# Altium PCB IMU.PcbDoc
Units mm, origin at the board's own origin, x right, y up, seen from the top; angles counter-clockwise.
Board outline 18.03 x 76.45 mm, 2 copper layers (Top Layer, Bottom Layer); 11 components, 10 nets, 43 pads, 6 vias.
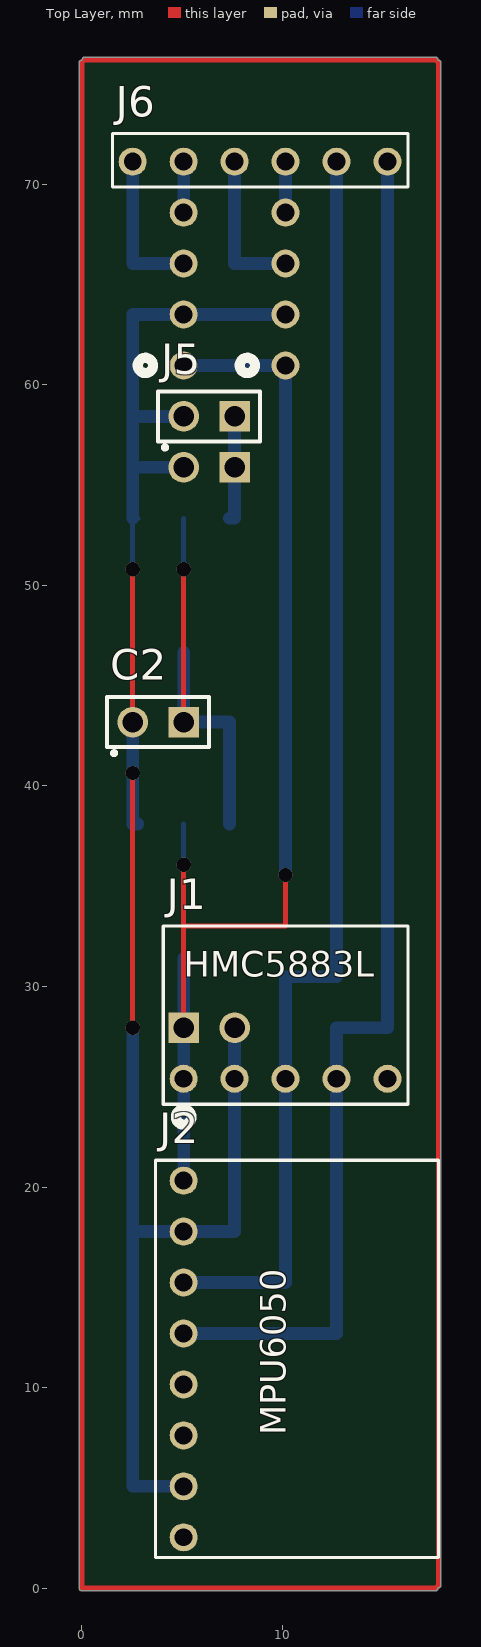
[diagram p0: Top Layer view]
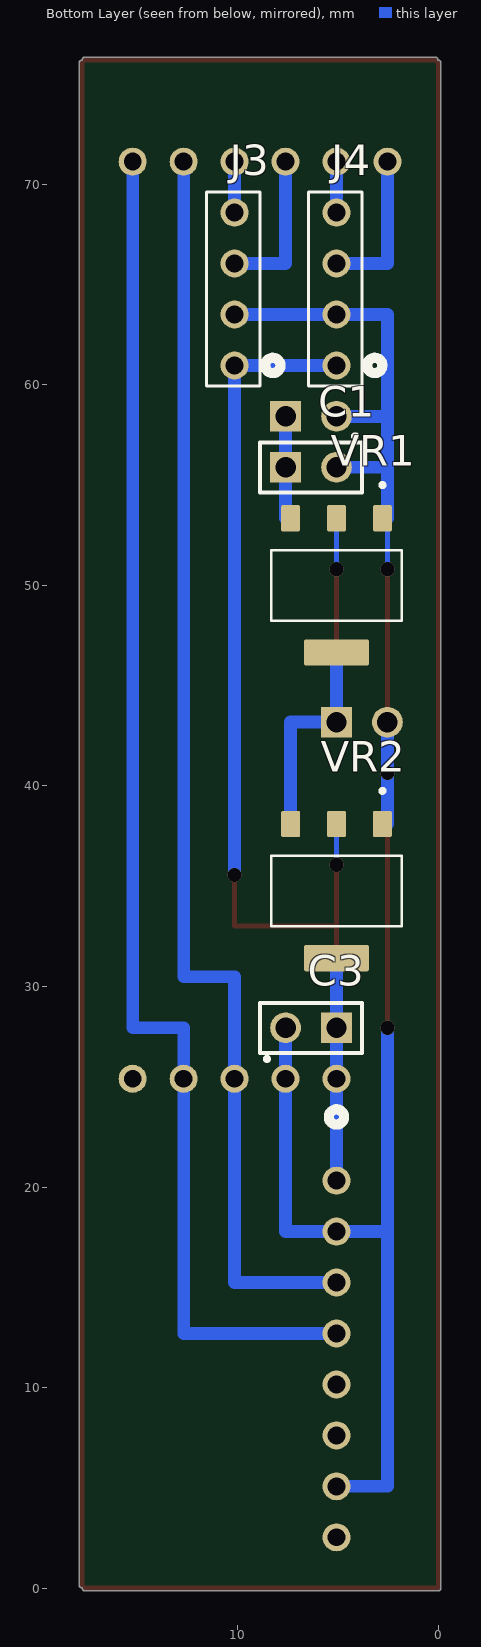
[diagram p1: Bottom Layer view, seen from below]

## Layer stack, top to bottom
Top Solder: solder mask 0.0102, Solder Resist, Dk 3.5
Top Layer: signal copper 0.0356
Dielectric 1: dielectric 0.32, FR-4, Dk 4.8
Bottom Layer: signal copper 0.0356
Bottom Solder: solder mask 0.0102, Solder Resist, Dk 3.5

## Board outline
0,-0.127 cw(c0,0) -0.127,0 -0.127,76.051 cw(c0,76.051) 0.024,76.176 cw(c0.149,76.2) 0.149,76.327 17.631,76.327 cw(c17.631,76.2) 17.759,76.2 17.756,76.176 cw(c17.78,76.051) 17.907,76.051 17.907,0.149 cw(c17.78,0.149) 17.756,0.024 17.759,0 cw(c17.631,0) 17.631,-0.127

## Design rules (kind name [scope] priority, off if disabled: settings)
Clearance [All] p1: gap=0.254 ignorepadtopadclearanceinfootprint=FALSE
PolygonConnect [All] p1: connectstyle=Relief reliefconductorwidth=0.254 reliefentries=4 polygonreliefangle="90 Angle" airgapwidth=0.254
RoutingVias [All] p1: holewidth=0.711 width=1.27 viastyle="Through Hole" minholewidth=0.711 minwidth=1.27 maxholewidth=0.711 maxwidth=1.27
SolderMaskExpansion [All] p1: expansion=0.102 istentingtop=FALSE
SupplyNets "Schematic Supply Nets_1" [InNet('GND')] p1: voltage=0.000
SupplyNets "Schematic Supply Nets" [InNet('6V5')] p2: voltage=0.000
Width [All] p1: maxlimit=0.635 minlimit=0.254 preferedwidth=0.254
30 further rules are at their usual default settings.

## Components (designator, comment, footprint, x,y, rotation, side; value= is the part's Value field where it differs from the comment)
C1 "10uF" 10UF 5.08,55.88 r0 bottom
C2 "10uF" 10UF 2.54,43.18 r0 top
C3 "10uF" 10UF 7.62,27.94 r180 bottom
J1 "HMC5883L" "5 POS HMC" 7.62,25.4 r0 top
J2 "MPU6050" "8 POS MPU6050" 5.08,7.62 r0 top
J3 "Wheel ENC" "Wheel ENC" 10.16,63.5 r90 bottom
J4 "Wheel ENC" "Wheel ENC" 5.08,63.5 r90 bottom
J5 "2 POS" "2 POS" 5.08,58.42 r0 top
J6 "6 POS" "6 POS" 15.24,71.12 r180 top
VR1 "5V" 3V3 5.08,49.995 r270 bottom
VR2 "3V3" 3V3 5.08,34.755 r270 bottom

## Footprints (in the part's own frame and the unit in brackets; to place one, negate y for a bottom-side part, rotate by r counter-clockwise, add the part's x,y. Pads: shape width x height; smd on the part's side, far side on the other; paste and mask are expansions set on the pad)
"2 POS" [mm]
  round 1.53 hole 1.02: 1(0,0)
  rect 1.53x1.53 / inner round 1.53 / far side rect 1.53x1.53 hole 1.02: 2(2.54,0)
  silkscreen extent -1.27,-1.65 3.81,1.24
3V3 [mm]
  rrect15% 1.31x0.93 smd: 1(-3.345,2.29) 2(-3.345,0) 3(-3.345,-2.29)
  rrect15% 1.31x3.24 smd: 4(3.345,0)
  silkscreen extent -5.1,-3.25 1.75,3.25, body extent -3.34,-3.25 3.65,3.25, height 1.8
"5 POS HMC" [mil]
  round 55 hole 35 paste-99999 mask+0: 1(-100,0) 2(0,0) 3(100,0) 4(200,0) 5(300,0)
  silkscreen extent -140,-90 340,300
"6 POS" [mil]
  round 55 hole 35 paste-99999 mask+0: 1(0,0) 2(100,0) 3(200,0) 4(300,0) 5(400,0) 6(500,0)
  silkscreen extent -40,-55 540,50
"8 POS MPU6050" [mil]
  round 55 hole 35 paste-99999 mask+0: 1(0,500) 2(0,400) 3(0,300) 4(0,200) 5(0,100) 6(0,0) 7(0,-100) 8(0,-200)
  silkscreen extent -55,-240 500,540
10UF [mm]
  round 1.53 hole 1.02: 1(0,0)
  rect 1.53x1.53 / inner round 1.53 / far side rect 1.53x1.53 hole 1.02: 2(2.54,0)
  silkscreen extent -1.27,-1.65 3.81,1.24
"Wheel ENC" [mil]
  round 55 hole 35 paste-99999 mask+0: 1(-100,0) 2(0,0) 3(100,0) 4(200,0)
  silkscreen extent -140,-90 240,55

## Part data
C1 C2 C3: "Pin Header, Board-to-Board, Wire-to-Board, 2.54 mm, 1 Rows, 2 Contacts, Through Hole, HTSW Series", Manufacturer=Samtec, Manufacturer Lifecycle Status=PRODUCTION, Manufacturer Part Number=HTSW-102-16-T-S, Category="Board to Board Connectors", ComponentLink1Description=https://datasheet.octopart.com:443/HTSW-102-16-T-S-Samtec-datasheet-97084101.pdf?src-supplier=Samtec, ComponentLink1URL=https://datasheet.octopart.com:443/HTSW-102-16-T-S-Samtec-datasheet-97084101.pdf?src-supplier=Samtec, ComponentLink2Description=https://sigma.octopart.com:443/14433675/technical_drawing/Samtec-HTSW-102-16-T-S.pdf?src-supplier=Samtec, ComponentLink2URL=https://sigma.octopart.com:443/14433675/technical_drawing/Samtec-HTSW-102-16-T-S.pdf?src-supplier=Samtec, ComponentLink3Description=https://datasheet.octopart.com:443/HTSW-102-16-T-S-Samtec-datasheet-150856372.pdf?src-supplier=Sager+Electronics, ComponentLink3URL=https://datasheet.octopart.com:443/HTSW-102-16-T-S-Samtec-datasheet-150856372.pdf?src-supplier=Sager+Electronics, ComponentLink4Description=https://datasheet.octopart.com:443/HTSW-102-16-T-S-Samtec-datasheet-151455181.pdf?src-supplier=Sager+Electronics, ComponentLink4URL=https://datasheet.octopart.com:443/HTSW-102-16-T-S-Samtec-datasheet-151455181.pdf?src-supplier=Sager+Electronics, ComponentLink5Description=https://datasheet.octopart.com:443/HTSW-102-16-T-S-Samtec-datasheet-136646178.pdf?src-supplier=Electro+Sonic, ComponentLink5URL=https://datasheet.octopart.com:443/HTSW-102-16-T-S-Samtec-datasheet-136646178.pdf?src-supplier=Electro+Sonic, ComponentLink6Description=https://datasheet.octopart.com:443/HTSW-102-16-T-S-Samtec-datasheet-62107121.pdf?src-supplier=Farnell, ComponentLink6URL=https://datasheet.octopart.com:443/HTSW-102-16-T-S-Samtec-datasheet-62107121.pdf?src-supplier=Farnell, ComponentLink7Description=https://datasheet.octopart.com:443/HTSW-102-16-T-S-Samtec-datasheet-180249195.pdf?src-supplier=JRH+Electronics, ComponentLink7URL=https://datasheet.octopart.com:443/HTSW-102-16-T-S-Samtec-datasheet-180249195.pdf?src-supplier=JRH+Electronics, ComponentLink8Description=https://datasheet.octopart.com/HTSW-102-16-T-S-Samtec-datasheet-86818365.pdf, ComponentLink8URL=https://datasheet.octopart.com/HTSW-102-16-T-S-Samtec-datasheet-86818365.pdf, ComponentLink9Description=https://datasheet.octopart.com:443/HTSW-102-16-T-S-Samtec-datasheet-21214457.pdf?src-supplier=Newark, ComponentLink9URL=https://datasheet.octopart.com:443/HTSW-102-16-T-S-Samtec-datasheet-21214457.pdf?src-supplier=Newark, Contact Material=Bronze, Contact Plating=Tin, Gender=Male, Lead Pitch=2.54mm, Lifecycle Status=Production, Mounting Technology="Through Hole", Number of Contacts=2, Number of Rows=1, Packaging=Bulk, Pitch=2.54mm, Pricing="1=0.1485, 1000=0.06895, 5000=0.0494, 10000=0.0491, 20000=0.04881 (USD)", Radiation Hardening=No, REACH SVHC=No, RoHS=Compliant, Stock=2347, Supplier=Avnet, Supplier Part Number=HTSW-102-16-T-S, Termination=Solder
J1: library part "5 POS HMC", "4POS CONN HEADER VERT  2.54MM", Manufacturer=Samtec, Manufacturer Lifecycle Status=PRODUCTION, Manufacturer Part Number=HTSW-104-23-T-S, Supplier Part Number=612-HTSW-104-23-T-S-ND, Category="Board to Board Connectors", ComponentLink1Description=https://datasheet.octopart.com:443/HTSW-104-23-T-S-Samtec-datasheet-97084101.pdf?src-supplier=Samtec, ComponentLink1URL=https://datasheet.octopart.com:443/HTSW-104-23-T-S-Samtec-datasheet-97084101.pdf?src-supplier=Samtec, ComponentLink2Description=https://sigma.octopart.com:443/14433675/technical_drawing/Samtec-HTSW-104-23-T-S.pdf?src-supplier=Samtec, ComponentLink2URL=https://sigma.octopart.com:443/14433675/technical_drawing/Samtec-HTSW-104-23-T-S.pdf?src-supplier=Samtec, ComponentLink3Description=https://datasheet.octopart.com:443/HTSW-104-23-T-S-Samtec-datasheet-136646178.pdf?src-supplier=Electro+Sonic, ComponentLink3URL=https://datasheet.octopart.com:443/HTSW-104-23-T-S-Samtec-datasheet-136646178.pdf?src-supplier=Electro+Sonic, ComponentLink4Description=https://datasheet.octopart.com:443/HTSW-104-23-T-S-Samtec-datasheet-150856372.pdf?src-supplier=Electro+Sonic, ComponentLink4URL=https://datasheet.octopart.com:443/HTSW-104-23-T-S-Samtec-datasheet-150856372.pdf?src-supplier=Electro+Sonic, ComponentLink5Description=https://datasheet.octopart.com:443/HTSW-104-23-T-S-Samtec-datasheet-62107121.pdf?src-supplier=Farnell, ComponentLink5URL=https://datasheet.octopart.com:443/HTSW-104-23-T-S-Samtec-datasheet-62107121.pdf?src-supplier=Farnell, ComponentLink6Description=https://datasheet.octopart.com:443/HTSW-104-23-T-S-Samtec-datasheet-180249195.pdf?src-supplier=JRH+Electronics, ComponentLink6URL=https://datasheet.octopart.com:443/HTSW-104-23-T-S-Samtec-datasheet-180249195.pdf?src-supplier=JRH+Electronics, ComponentLink7Description=https://datasheet.octopart.com:443/HTSW-104-23-T-S-Samtec-datasheet-151455181.pdf?src-supplier=Sager+Electronics, ComponentLink7URL=https://datasheet.octopart.com:443/HTSW-104-23-T-S-Samtec-datasheet-151455181.pdf?src-supplier=Sager+Electronics, ComponentLink8Description=https://datasheet.octopart.com/HTSW-104-23-T-S-Samtec-datasheet-86818365.pdf, ComponentLink8URL=https://datasheet.octopart.com/HTSW-104-23-T-S-Samtec-datasheet-86818365.pdf, ComponentLink9Description=https://datasheet.octopart.com:443/HTSW-104-23-T-S-Samtec-datasheet-21214457.pdf?src-supplier=Newark, ComponentLink9URL=https://datasheet.octopart.com:443/HTSW-104-23-T-S-Samtec-datasheet-21214457.pdf?src-supplier=Newark, Contact Material=Bronze, Contact Plating=Tin, Gender=Male, Lead Pitch=2.54mm, Lifecycle Status=Production, Mounting Technology="Through Hole", Number of Contacts=4, Number of Rows=1, Packaging=Bulk, Pitch=2.54mm, Pricing="1=0.33 (USD)", Radiation Hardening=No, REACH SVHC=No, RoHS=Compliant, Supplier=DigiKey, Termination=Solder
J2: library part "8 POS MPU6050", "Strip Terminal Block, 8A, 0.5mm2, 1 Row(s), 1 Deck(s)", Color=Black, Contact Resistance=1.8mΩ, Current=10A, Current Rating=8A, Flammability Rating="UL94 V-0", Manufacturer="Phoenix Contact", Manufacturer Lifecycle Status=AVAILABLE, Manufacturer Part Number=1945151, Max Current Rating=6A, Supplier Part Number=651-1945151, Voltage=300V, Voltage Rating=160V, Approvals=UL, Category="Terminal Blocks", China RoHS=Compliant, ComponentLink1Description=https://datasheet.octopart.com:443/1945151-Phoenix-Contact-datasheet-66579491.pdf?src-supplier=element14+APAC, ComponentLink1URL=https://datasheet.octopart.com:443/1945151-Phoenix-Contact-datasheet-66579491.pdf?src-supplier=element14+APAC, ComponentLink2Description=https://datasheet.octopart.com:443/PST-1.0/8-3.5-Phoenix-Contact-datasheet-8822167.pdf?src-supplier=element14+APAC, ComponentLink2URL=https://datasheet.octopart.com:443/PST-1.0/8-3.5-Phoenix-Contact-datasheet-8822167.pdf?src-supplier=element14+APAC, ComponentLink3Description=https://datasheet.octopart.com:443/1945151-Phoenix-Contact-datasheet-175456693.pdf?src-supplier=Master+Electronics, ComponentLink3URL=https://datasheet.octopart.com:443/1945151-Phoenix-Contact-datasheet-175456693.pdf?src-supplier=Master+Electronics, ComponentLink4Description=https://datasheet.octopart.com:443/1945151-Phoenix-Contact-datasheet-154783991.pdf?src-supplier=Electro+Sonic, ComponentLink4URL=https://datasheet.octopart.com:443/1945151-Phoenix-Contact-datasheet-154783991.pdf?src-supplier=Electro+Sonic, ComponentLink5Description=https://datasheet.octopart.com:443/1945151-Phoenix-Contact-datasheet-33525158.pdf?src-supplier=MRO+Stop, ComponentLink5URL=https://datasheet.octopart.com:443/1945151-Phoenix-Contact-datasheet-33525158.pdf?src-supplier=MRO+Stop, ComponentLink6Description=https://datasheet.octopart.com:443/1945151-Phoenix-Contact-datasheet-164875081.pdf?src-supplier=Burklin+Elektronik, ComponentLink6URL=https://datasheet.octopart.com:443/1945151-Phoenix-Contact-datasheet-164875081.pdf?src-supplier=Burklin+Elektronik, ComponentLink7Description=https://datasheet.octopart.com:443/1945151-Phoenix-Contact-datasheet-54101.pdf?src-supplier=DigiKey, ComponentLink7URL=https://datasheet.octopart.com:443/1945151-Phoenix-Contact-datasheet-54101.pdf?src-supplier=DigiKey, ComponentLink8Description=https://datasheet.octopart.com:443/1945151-Phoenix-Contact-datasheet-94777.pdf?src-supplier=RS+(Formerly+Allied+Electronics), ComponentLink8URL=https://datasheet.octopart.com:443/1945151-Phoenix-Contact-datasheet-94777.pdf?src-supplier=RS+(Formerly+Allied+Electronics), ComponentLink9Description=https://datasheet.octopart.com:443/1945151-Phoenix-Contact-datasheet-62084791.pdf?src-supplier=RS+(Formerly+Allied+Electronics), ComponentLink9URL=https://datasheet.octopart.com:443/1945151-Phoenix-Contact-datasheet-62084791.pdf?src-supplier=RS+(Formerly+Allied+Electronics), ComponentLink10Description=http://sigma.octopart.com:80/195219851/materials_sheet/Phoenix-Contact-1945151.pdf?src-supplier=Compliance+Statements, ComponentLink10URL=http://sigma.octopart.com:80/195219851/materials_sheet/Phoenix-Contact-1945151.pdf?src-supplier=Compliance+Statements, Contact Plating=Tin, Country of Origin=Germany, Depth=2.8mm, Export Control Classification Number (ECCN) Code=EAR99, Harmonized Tariff Schedule (HTS) Code=8536.90.40.00, Housing Color=Black, Introduction Date=2002-11-26, Lead Free="Lead Free", Lifecycle Status=Production, Mounting Technology=Solder, Number of Contacts=8, Number of Levels=1, Number of Positions=8, Number of Positions Per Level=8, Number of Rows=1, Orientation=Straight, Packaging=Bulk, Pins=8, Pitch=3.5mm, Pricing="1=0.76, 10=0.76, 50=0.76, 100=0.76, 1000=0.76, 10000=0.76 (USD)", REACH SVHC=Unaffected, RoHS=Compliant, Stock=5397, Supplier=Mouser, Termination=Solder, Weight=869.990166mg, Width=24.5mm, Wire/Cable Gauge=20AWG
J3 J4: "4POS CONN HEADER VERT  2.54MM", Manufacturer=Samtec, Manufacturer Lifecycle Status=PRODUCTION, Manufacturer Part Number=HTSW-104-23-T-S, Supplier Part Number=612-HTSW-104-23-T-S-ND, Category="Board to Board Connectors", ComponentLink1Description=https://datasheet.octopart.com:443/HTSW-104-23-T-S-Samtec-datasheet-97084101.pdf?src-supplier=Samtec, ComponentLink1URL=https://datasheet.octopart.com:443/HTSW-104-23-T-S-Samtec-datasheet-97084101.pdf?src-supplier=Samtec, ComponentLink2Description=https://sigma.octopart.com:443/14433675/technical_drawing/Samtec-HTSW-104-23-T-S.pdf?src-supplier=Samtec, ComponentLink2URL=https://sigma.octopart.com:443/14433675/technical_drawing/Samtec-HTSW-104-23-T-S.pdf?src-supplier=Samtec, ComponentLink3Description=https://datasheet.octopart.com:443/HTSW-104-23-T-S-Samtec-datasheet-136646178.pdf?src-supplier=Electro+Sonic, ComponentLink3URL=https://datasheet.octopart.com:443/HTSW-104-23-T-S-Samtec-datasheet-136646178.pdf?src-supplier=Electro+Sonic, ComponentLink4Description=https://datasheet.octopart.com:443/HTSW-104-23-T-S-Samtec-datasheet-150856372.pdf?src-supplier=Electro+Sonic, ComponentLink4URL=https://datasheet.octopart.com:443/HTSW-104-23-T-S-Samtec-datasheet-150856372.pdf?src-supplier=Electro+Sonic, ComponentLink5Description=https://datasheet.octopart.com:443/HTSW-104-23-T-S-Samtec-datasheet-62107121.pdf?src-supplier=Farnell, ComponentLink5URL=https://datasheet.octopart.com:443/HTSW-104-23-T-S-Samtec-datasheet-62107121.pdf?src-supplier=Farnell, ComponentLink6Description=https://datasheet.octopart.com:443/HTSW-104-23-T-S-Samtec-datasheet-180249195.pdf?src-supplier=JRH+Electronics, ComponentLink6URL=https://datasheet.octopart.com:443/HTSW-104-23-T-S-Samtec-datasheet-180249195.pdf?src-supplier=JRH+Electronics, ComponentLink7Description=https://datasheet.octopart.com:443/HTSW-104-23-T-S-Samtec-datasheet-151455181.pdf?src-supplier=Sager+Electronics, ComponentLink7URL=https://datasheet.octopart.com:443/HTSW-104-23-T-S-Samtec-datasheet-151455181.pdf?src-supplier=Sager+Electronics, ComponentLink8Description=https://datasheet.octopart.com/HTSW-104-23-T-S-Samtec-datasheet-86818365.pdf, ComponentLink8URL=https://datasheet.octopart.com/HTSW-104-23-T-S-Samtec-datasheet-86818365.pdf, ComponentLink9Description=https://datasheet.octopart.com:443/HTSW-104-23-T-S-Samtec-datasheet-21214457.pdf?src-supplier=Newark, ComponentLink9URL=https://datasheet.octopart.com:443/HTSW-104-23-T-S-Samtec-datasheet-21214457.pdf?src-supplier=Newark, Contact Material=Bronze, Contact Plating=Tin, Gender=Male, Lead Pitch=2.54mm, Lifecycle Status=Production, Mounting Technology="Through Hole", Number of Contacts=4, Number of Rows=1, Packaging=Bulk, Pitch=2.54mm, Pricing="1=0.33 (USD)", Radiation Hardening=No, REACH SVHC=No, RoHS=Compliant, Supplier=DigiKey, Termination=Solder
VR1 VR2: "10mA positive electrode fixed 3.3V 15V 6mV SOT-223 SMD mount 3.71mm(width)*1.8mm(height)", Case/Package=SOT-223-3, Dropout Voltage=1.1V, Manufacturer="Analog Devices", Manufacturer Lifecycle Status=PRODUCTION, Manufacturer Part Number=LT1117CST-3.3#PBF, Max Operating Temperature=125°C, Max Output current=800mA, Max Supply Voltage=15V, Min Input Voltage=2.45V, Min Operating Temperature=0°C, Nominal Output Voltage=3.3V, Operating Supply Current=5mA, Output Voltage Accuracy=1%, Power Supply Rejection Ratio (PSRR)=75dB, Quiescent Current=10mA, Reference Voltage=1.27V, Supplier Part Number=505-LT1117CST-3.3#PBF-ND, Category="LDO Voltage Regulators", ComponentLink1Description=https://datasheet.octopart.com:443/LT1117CST-3.3%23PBF-Analog-Devices-datasheet-10688060.pdf?src-supplier=element14+APAC, ComponentLink1URL=https://datasheet.octopart.com:443/LT1117CST-3.3%23PBF-Analog-Devices-datasheet-10688060.pdf?src-supplier=element14+APAC, ComponentLink2Description=https://octopart.com:443/opatz8j6/c1?t=sxPfvuRhnwazmxrmq8OcozQ_deCTcj93l61TCwHHAMrfHd1zMJUbDN1BQRyopVTPT06EZltW9au6ThzHazGz_K01nYGgQQbAqUW7xZoQbMQj_Tk9mo54BoGqI58goAQNKChcZH57xe3yJR3CLvqjnZIhvnC6ZUnXmbxCUgfO7NVBhd06IAa9UBMTy5__Do4QRO1H7gN19Bt_59SFkSqeidpjLdGkU2gnUhcEunfk7eyIcREwc1Qh4I3mNFWWaQ5DTh2xZX-NMPM0Sc5KZLLtUjKhzoxxlKwGl3cc6mUQ8r87b7CLjsspdA&src-supplier=Analog+Devices, ComponentLink2URL=https://octopart.com:443/opatz8j6/c1?t=sxPfvuRhnwazmxrmq8OcozQ_deCTcj93l61TCwHHAMrfHd1zMJUbDN1BQRyopVTPT06EZltW9au6ThzHazGz_K01nYGgQQbAqUW7xZoQbMQj_Tk9mo54BoGqI58goAQNKChcZH57xe3yJR3CLvqjnZIhvnC6ZUnXmbxCUgfO7NVBhd06IAa9UBMTy5__Do4QRO1H7gN19Bt_59SFkSqeidpjLdGkU2gnUhcEunfk7eyIcREwc1Qh4I3mNFWWaQ5DTh2xZX-NMPM0Sc5KZLLtUjKhzoxxlKwGl3cc6mUQ8r87b7CLjsspdA&src-supplier=Analog+Devices, ComponentLink3Description=https://datasheet.octopart.com:443/LT1117CST-3.3%23PBF-Linear-Technology-datasheet-501865.pdf?src-supplier=element14, ComponentLink3URL=https://datasheet.octopart.com:443/LT1117CST-3.3%23PBF-Linear-Technology-datasheet-501865.pdf?src-supplier=element14, ComponentLink4Description=https://datasheet.octopart.com:443/LT1117CST-3.3%23PBF-Analog-Devices-datasheet-11554267.pdf?src-supplier=SOS+electronic, ComponentLink4URL=https://datasheet.octopart.com:443/LT1117CST-3.3%23PBF-Analog-Devices-datasheet-11554267.pdf?src-supplier=SOS+electronic, ComponentLink5Description=https://sigma.octopart.com:443/57690395/technical_drawing/Linear-Technology-LT1117CST-3.3%23PBF.pdf?src-supplier=Linear+Technology, ComponentLink5URL=https://sigma.octopart.com:443/57690395/technical_drawing/Linear-Technology-LT1117CST-3.3%23PBF.pdf?src-supplier=Linear+Technology, ComponentLink6Description=https://datasheet.octopart.com:443/LT1117CST-3.3%23PBF-Linear-Technology-datasheet-8209746.pdf?src-supplier=Jameco+(USA), ComponentLink6URL=https://datasheet.octopart.com:443/LT1117CST-3.3%23PBF-Linear-Technology-datasheet-8209746.pdf?src-supplier=Jameco+(USA), ComponentLink7Description=http://sigma.octopart.com:80/conflict_mineral_statement/Analog-Devices-company-33.pdf?src-supplier=Compliance+Statements, ComponentLink7URL=http://sigma.octopart.com:80/conflict_mineral_statement/Analog-Devices-company-33.pdf?src-supplier=Compliance+Statements, ComponentLink8Description=https://octopart.com:443/opatz8j6/c1?t=Itd0_Rzn44atCgyqqsaW9vqyNROmcDdOOlmDNuHQy5sG6RlJFqPrF18Q09GdkdA4DnnOnQyFiKa-xTy84isrbvQcKhyHdREctLTuDeXElH90lmN1SFw106Zq8a491SeXECFg075oa3RZHoUhm261CrSHgUqgifs4IJe2bcS4VG6cTp0XbT4a9-5BFrudppU15yqarzS6nzIestfbH4UNq1eEbTliTQbkkowoZRDFvmMPpk22GyonWMwg9GqKAKAtjcwvRjM6GvyXDZLmJkvlZxPaACvllw-u3xX1LKWDQgG40xXiC5YhaA&src-supplier=Compliance+Statements, ComponentLink8URL=https://octopart.com:443/opatz8j6/c1?t=Itd0_Rzn44atCgyqqsaW9vqyNROmcDdOOlmDNuHQy5sG6RlJFqPrF18Q09GdkdA4DnnOnQyFiKa-xTy84isrbvQcKhyHdREctLTuDeXElH90lmN1SFw106Zq8a491SeXECFg075oa3RZHoUhm261CrSHgUqgifs4IJe2bcS4VG6cTp0XbT4a9-5BFrudppU15yqarzS6nzIestfbH4UNq1eEbTliTQbkkowoZRDFvmMPpk22GyonWMwg9GqKAKAtjcwvRjM6GvyXDZLmJkvlZxPaACvllw-u3xX1LKWDQgG40xXiC5YhaA&src-supplier=Compliance+Statements, Height=1.8mm, Lead Free="Lead Free", Length=6.71mm, Lifecycle Status=Production, Min Current Limit=800mA, Mounting Technology="Surface Mount", Number of Channels=1, Number of Outputs=1, Number of Regulators=1, Output Current=800mA, Output Type=Fixed, Output Voltage=3.3V, Packaging=Bulk, Pins=3, Polarity=Positive, Pricing="1=7.96, 10=6.16, 78=5.28808, 156=5.09051, 312=4.92788, 546=4.81782, 1014=4.71464 (USD)", Radiation Hardening=No, REACH SVHC=Unaffected, RoHS=Compliant, Schedule B="8542390000, 8542390000|8542390000|8542390000|8542390000|8542390000|8542390000|8542390000|8542390000|8542390000|8542390000|8542390000|8542390000|8542390000|8542390000|8542390000|8542390000|8542390000|8542390000|8542390000|8542390000|8542390000|8542390000|8542390000|85", Stock=5446, Supplier=DigiKey, Width=3.71mm

## Via types
v1: diameter 0.711, hole 0.711, Top Layer to Bottom Layer, 6 vias

## Nets (pads, with @x,y where several pads share a name; then routed paths per layer and width w, separated by ;. In a path a pad name is that pad's centre, name@x,y a point inside that pad or via, vN(x,y) a via of type N, cw(c..) or ccw(c..) an arc to the next point about the centre after c; other vN are vias at no path point)
3V3_OUT: C3.2 J1.1 J2.1 J3.1 J4.1 VR2.2 VR2.4 | length 59.4
  Top Layer w0.254: C3.2 5.08,33.02 ; v1(5.08,36.068) 5.08,33.02 ; v1(10.16,35.56) 10.16,33.02 5.08,33.02
  Bottom Layer w0.254: v1(5.08,36.068) VR2.2
  Bottom Layer w0.635: J2.1 J1.1 C3.2 VR2.4 ; J4.1 J3.1 v1(10.16,35.56)
6V5: C1.2 J5.2 VR1.3 | length 5.3
  Bottom Layer w0.635: VR1.3 7.62,53.34 C1.2 J5.2
"CH A1": J3.4 J6.3 | length 2.5
  Bottom Layer w0.635: J3.4 J6.3
"CH A2": J4.4 J6.5 | length 2.5
  Bottom Layer w0.635: J4.4 J6.5
"CH B1": J3.3 J6.4 | length 7.6
  Bottom Layer w0.635: J6.4 7.62,66.04 J3.3
"CH B2": J4.3 J6.6 | length 7.6
  Bottom Layer w0.635: J6.6 2.54,66.04 J4.3
GND: C1.1 C2.1 C3.1 J1.2 J2.2 J2.7 J3.2 J4.2 J5.1 VR1.1 VR2.1 | length 91.9
  Top Layer w0.254: v1(2.54,27.94) v1(2.54,40.64) ; C2.1 v1(2.54,50.8)
  Bottom Layer w0.254: v1(2.54,50.8) 2.54,53.34 VR1.1
  Bottom Layer w0.635: v1(2.54,27.94) 2.54,17.78 ; C2.1 v1(2.54,40.64) 2.54,38.1 VR2.1 ; VR1.1@2.54,53.34 2.54,55.88 ; J2.7 2.54,5.08 2.54,17.78 ; C1.1 2.54,55.88 ; J5.1 2.54,58.42 ; C3.1 J1.2 7.62,17.78 J2.2 2.54,17.78 ; J3.2 J4.2 2.54,63.5 2.54,58.42 ; 2.54,55.88 2.54,58.42
NetC2_2: C2.2 VR1.2 VR1.4 VR2.3 | length 21
  Top Layer w0.254: C2.2 v1(5.08,50.8)
  Bottom Layer w0.254: v1(5.08,50.8) VR1.2
  Bottom Layer w0.635: VR1.4 C2.2 7.37,43.18 VR2.3
SCL: J1.3 J2.3 J6.2 | length 63.5
  Bottom Layer w0.635: J2.3 10.16,15.24 J1.3 10.16,30.48 12.7,30.48 J6.2
SDA: J1.4 J2.4 J6.1 | length 68.6
  Bottom Layer w0.635: J2.4 12.7,12.7 J1.4 12.7,27.94 15.24,27.94 J6.1
pads on no net: J1.5 J2.5 J2.6 J2.8
copper on no net: | length 187.7
  Top Layer w0.254: 0,0 0,76.051 0.149,76.2 17.631,76.2 17.78,76.051 17.78,0.149 17.631,0 0,0